# Altium PCB PCB1.PcbDoc (part 3 of 3)
Units mm, origin at the board's own origin, x right, y up, seen from the top; angles counter-clockwise.
Board outline 35.05 x 35.05 mm, 2 copper layers (Top Layer, Bottom Layer); 270 components, 213 nets, 927 pads, 0 vias.
Unrouted connection lines stored in the file: 589.
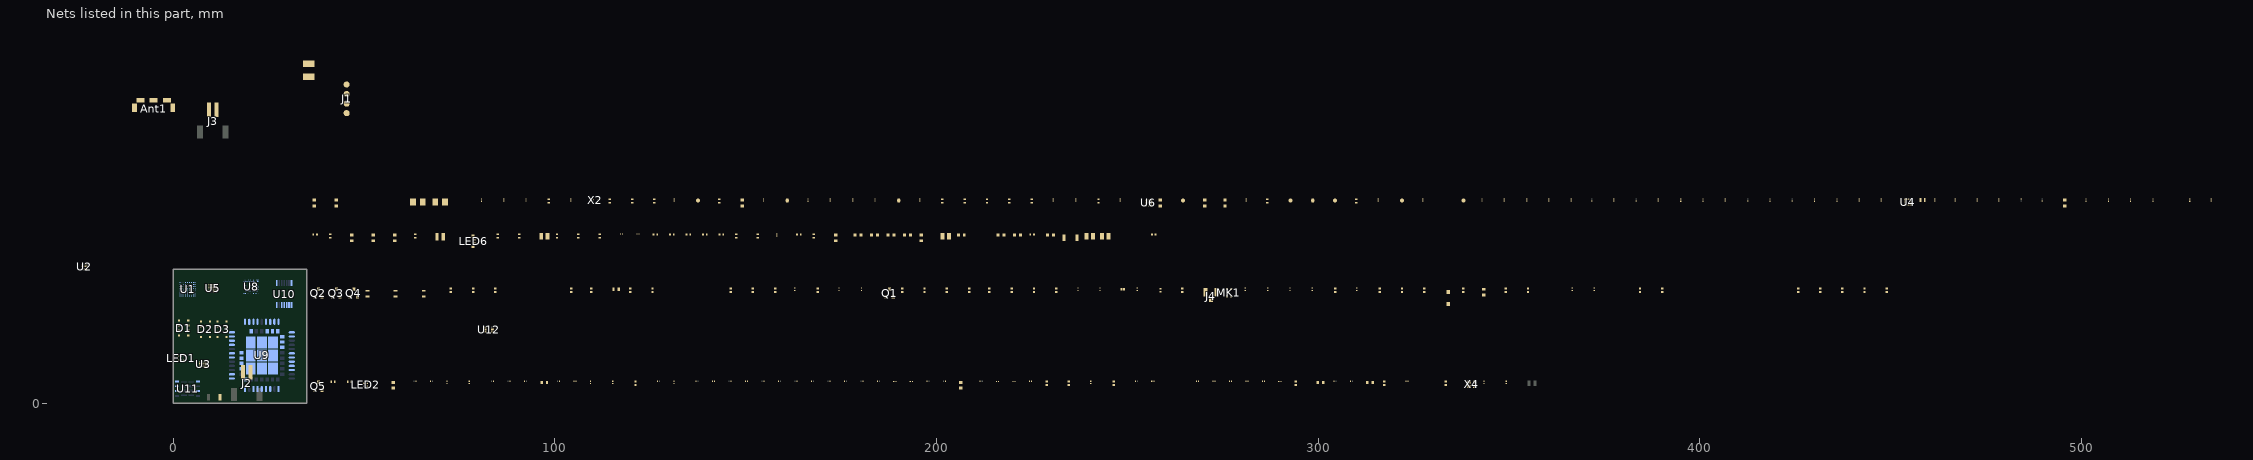
[diagram p2: the nets of this part, all layers, seen from the top]

## Part data (continued)
R1: library part AR03BTCX2502, "100mW Thin Film Resistor 50V ±25ppm/℃ ±0.1% 25kΩ 0603 Chip Resistor - Surface Mount ROHS", LCSC Part Number=C2828637, Manufacturer="Viking Tech", Package=0603, ComponentLink1Description=LCSC, ComponentLink1URL=https://www.lcsc.com/product-detail/Chip-Resistor-Surface-Mount_Viking-Tech-AR03BTCX2502_C2828637.html, Item Type=Resistor, Manufacturer Part Number=AR03BTCX2502
R2: library part HQ02WAJ0103TCE, "100mW 50V ±100ppm/℃ ±5% 10kΩ 0402 Chip Resistor - Surface Mount ROHS", LCSC Part Number=C414854, Manufacturer=UNI-ROYAL, Package=0402, ComponentLink1Description=LCSC, ComponentLink1URL=https://www.lcsc.com/product-detail/Chip-Resistor-Surface-Mount_UNI-ROYAL-Uniroyal-Elec-HQ02WAJ0103TCE_C414854.html, Item Type=Resistor, Manufacturer Part Number=HQ02WAJ0103TCE
R3 R4: library part RC0201FR-074K7L, "RES 4.7K OHM 1% 1/20W 0201", LCSC Part Number=C138135, Manufacturer=Yageo, Supplier Part Number=7537285, Category="Chip SMD Resistors", ComponentLink1Description=https://datasheet.ciiva.com/2493/pyu-r-int-thick-7-2493811.pdf?src-supplier=Digi-Key, ComponentLink1URL=https://datasheet.ciiva.com/2493/pyu-r-int-thick-7-2493811.pdf?src-supplier=Digi-Key, ComponentLink2Description=https://datasheet.ciiva.com/2493/pyu-r-int-thick-7-2493812.pdf?src-supplier=Digi-Key, ComponentLink2URL=https://datasheet.ciiva.com/2493/pyu-r-int-thick-7-2493812.pdf?src-supplier=Digi-Key, ComponentLink3Description=https://datasheet.ciiva.com/2493/pyu-r-int-thick-7-2493813.pdf?src-supplier=Digi-Key, ComponentLink3URL=https://datasheet.ciiva.com/2493/pyu-r-int-thick-7-2493813.pdf?src-supplier=Digi-Key, ComponentLink4Description=https://datasheet.ciiva.com/8892/pyu-rc0201-51-rohs-l-8-8892942.pdf?src-supplier=Avnet, ComponentLink4URL=https://datasheet.ciiva.com/8892/pyu-rc0201-51-rohs-l-8-8892942.pdf?src-supplier=Avnet, ComponentLink5Description=https://datasheet.ciiva.com/7672/1563626-7672233.pdf?src-supplier=Element14, ComponentLink5URL=https://datasheet.ciiva.com/7672/1563626-7672233.pdf?src-supplier=Element14, Item Type=Resistor, Manufacturer Part Number=RC0201FR-074K7L, Pricing="10000=0.0014, 50000=0.0013, 250000=0.0013, 750000=0.0012, 2000000=0.0011 (USD)", RoHS=Yes, Stock=1610000, Supplier="Future Electronics"
R5 R6 R7 R8 R9 R10: library part RC0402FR-0710KL, "RES 10K OHM 1% 1/16W 0402", Case Code (Imperial)=0402, Case Code (Metric)=1005, LCSC Part Number=C60490, Manufacturer=Yageo, Max Operating Temperature=155°C, Max Power Dissipation=63mW, Min Operating Temperature=-55°C, Power Rating=62.5mW, Resistance=10kR, Resistance Tolerance=1%, Resistor Type="Thick Film", Supplier Part Number 1=603-RC0402FR-0710KL, Temperature Coefficient=100ppm/°C, Voltage Rating=50V, Case/Package=0402, Category="Chip SMD Resistors", ComponentLink1Description=https://datasheet.ciiva.com/7660/38568-7660787.pdf?src-supplier=Element14, ComponentLink1URL=https://datasheet.ciiva.com/7660/38568-7660787.pdf?src-supplier=Element14, ComponentLink2Description=https://datasheet.ciiva.com/7849/1686128-7849814.pdf?src-supplier=Element14, ComponentLink2URL=https://datasheet.ciiva.com/7849/1686128-7849814.pdf?src-supplier=Element14, ComponentLink3Description=https://datasheet.ciiva.com/7983/1018594-7983486.pdf?src-supplier=Element14, ComponentLink3URL=https://datasheet.ciiva.com/7983/1018594-7983486.pdf?src-supplier=Element14, ComponentLink4Description=https://datasheet.ciiva.com/22747/1018594-22747512.pdf?src-supplier=Element14, ComponentLink4URL=https://datasheet.ciiva.com/22747/1018594-22747512.pdf?src-supplier=Element14, ComponentLink5Description=https://datasheet.ciiva.com/12667/pyu-rc0402-51-rohs-l-6-r-12667067.pdf?src-supplier=Mouser, ComponentLink5URL=https://datasheet.ciiva.com/12667/pyu-rc0402-51-rohs-l-6-r-12667067.pdf?src-supplier=Mouser, ComponentLink6Description=https://datasheet.ciiva.com/7849/1784430-7849813.pdf?src-supplier=Element14, ComponentLink6URL=https://datasheet.ciiva.com/7849/1784430-7849813.pdf?src-supplier=Element14, ComponentLink7Description=https://datasheet.ciiva.com/7849/1784430-7849815.pdf?src-supplier=Element14, ComponentLink7URL=https://datasheet.ciiva.com/7849/1784430-7849815.pdf?src-supplier=Element14, Construction=Rectangular, Depth=0.5mm, Features="Moisture Resistant", Height=0.32mm, Item Type=Resistor, Lead Free="Lead Free", Lead Pitch=0.2mm, Length=1mm, Manufacturer Part Number=RC0402FR-0710KL, Military Standard=Not, Number of Pins=2, Number of Terminations=2, Packaging="Tape and Reel", Pricing 1="1=0.10000, 10=0.01400, 50=0.01400, 100=0.00500, 1000=0.00300, 10000=0.00200 (USD)", REACH SVHC="No SVHC", RoHS=Yes, RoHS Compliant=Yes, Series=RC, Stock 1=18648329, Supplier 1=Mouser, Termination=SMD/SMT, Tolerance=1%, Voltage Rating (DC)=50V, Width=0.5mm, Working Voltage=50V
R11: library part RC0402FR-074K7L, "RES 4.7K OHM 1% 1/16W 0402", Case Code (Imperial)=0402, Case Code (Metric)=1005, LCSC Part Number=C105871, Manufacturer=Yageo, Max Operating Temperature=155°C, Max Power Dissipation=63mW, Min Operating Temperature=-55°C, Power Rating=62.5mW, Resistance=4.7kR, Resistance Tolerance=1%, Resistor Type="Thick Film", Temperature Coefficient=100ppm/°C, Voltage Rating=50V, Case/Package=0402, Category="Chip SMD Resistors", ComponentLink1Description=https://datasheet.ciiva.com/22661/1686128-22661342.pdf?src-supplier=Element14, ComponentLink1URL=https://datasheet.ciiva.com/22661/1686128-22661342.pdf?src-supplier=Element14, ComponentLink2Description=https://datasheet.ciiva.com/7850/1018594-7850022.pdf?src-supplier=Element14, ComponentLink2URL=https://datasheet.ciiva.com/7850/1018594-7850022.pdf?src-supplier=Element14, ComponentLink3Description=https://datasheet.ciiva.com/7850/1018594-7850023.pdf?src-supplier=Element14, ComponentLink3URL=https://datasheet.ciiva.com/7850/1018594-7850023.pdf?src-supplier=Element14, ComponentLink4Description=https://datasheet.ciiva.com/15215/getdatasheetpartid-328119-15215035.pdf?src-supplier=Verical, ComponentLink4URL=https://datasheet.ciiva.com/15215/getdatasheetpartid-328119-15215035.pdf?src-supplier=Verical, Construction=Rectangular, Depth=0.5mm, Features="Moisture Resistant", Height=0.32mm, Height - Seated (Max)=0.016inch, Item Type=Resistor, Lead Free="Lead Free", Length=1mm, Manufacturer Part Number=RC0402FR-074K7L, Military Standard=Not, Number of Pins=2, Number of Terminations=2, Packaging="Tape and Reel", Pricing 1="10000=0.00085 (USD)", Reach SVHC Compliant=Yes, RoHS=Yes, RoHS Compliant=Yes, Series=RC, Size Code=0402, Stock 1=2420000, Supplier 1=Avnet, Supplier Part Number 1=RC0402FR-074K7L, Termination=SMD/SMT, Tolerance=1%, Voltage Rating (DC)=50V, Width=0.5mm
R12: library part PE0402FRF470R01L, "RES 0.01 OHM 1% 1/4W 0402", Case/Package=0402, LCSC Part Number=C851613, Manufacturer=Yageo, Max Operating Temperature=125°C, Max Power Dissipation=250mW, Min Operating Temperature=-55°C, Package Quantity=10000, Supplier Part Number=13-PE0402FRF470R01LDKR-ND, Temperature Coefficient=100ppm/°C, Tolerance=1%, Category="Chip SMD Resistors", ComponentLink1Description=http://www.mouser.com/ds/2/447/PYu-PE_521_RoHS_L_3-771548.pdf?src-supplier=Mouser, ComponentLink1URL=http://www.mouser.com/ds/2/447/PYu-PE_521_RoHS_L_3-771548.pdf?src-supplier=Mouser, ComponentLink2Description=http://www.yageo.com/documents/recent/PYu-PE_521_RoHS_L_5.pdf?src-supplier=Digikey, ComponentLink2URL=http://www.yageo.com/documents/recent/PYu-PE_521_RoHS_L_5.pdf?src-supplier=Digikey, Features="Moisture Resistant,Automotive AEC-Q200", Height=0.02inch, Item Type=Resistor, Length=0.039inch, Manufacturer Part Number=PE0402FRF470R01L, Number of Terminations=2, Packaging="Tape and Reel", Pricing="1=0.87, 10=0.719, 25=0.666, 50=0.6086, 100=0.5006, 250=0.45928, 500=0.3812, 1000=0.31002, 5000=0.29578 (USD)", RoHS=Yes, Series=PE, Supplier=Digikey, Width=0.02inch
R13 R79: library part RC0402FR-07100KL, "RES 100K OHM 1% 1/16W 0402", Case Code (Imperial)=0402, Case Code (Metric)=1005, LCSC Part Number=C60491, Manufacturer=Yageo, Max Operating Temperature=155°C, Max Power Dissipation=63mW, Min Operating Temperature=-55°C, Package Quantity=1, Resistance=100kR, Resistance Tolerance=1%, Resistor Type="Thick Film", Supplier Part Number 1=603-RC0402FR-07100KL, Temperature Coefficient=100ppm/°C, Voltage Rating=50V, Case/Package=0402, Category="Chip SMD Resistors", ComponentLink1Description=https://datasheet.ciiva.com/11819/0900766b80c66297-11819452.pdf?src-supplier=RSComponents, ComponentLink1URL=https://datasheet.ciiva.com/11819/0900766b80c66297-11819452.pdf?src-supplier=RSComponents, ComponentLink2Description=https://datasheet.ciiva.com/22747/1018594-22747509.pdf?src-supplier=Element14, ComponentLink2URL=https://datasheet.ciiva.com/22747/1018594-22747509.pdf?src-supplier=Element14, ComponentLink3Description=https://datasheet.ciiva.com/2453/pyu-r-int-thick-7-2453362.pdf?src-supplier=Digi-Key, ComponentLink3URL=https://datasheet.ciiva.com/2453/pyu-r-int-thick-7-2453362.pdf?src-supplier=Digi-Key, ComponentLink4Description=https://datasheet.ciiva.com/2453/pyu-r-int-thick-7-2453363.pdf?src-supplier=Digi-Key, ComponentLink4URL=https://datasheet.ciiva.com/2453/pyu-r-int-thick-7-2453363.pdf?src-supplier=Digi-Key, ComponentLink5Description=https://datasheet.ciiva.com/2453/pyu-r-int-thick-7-2453361.pdf?src-supplier=Digi-Key, ComponentLink5URL=https://datasheet.ciiva.com/2453/pyu-r-int-thick-7-2453361.pdf?src-supplier=Digi-Key, ComponentLink6Description=https://datasheet.ciiva.com/12667/pyu-rc0402-51-rohs-l-6-r-12667930.pdf?src-supplier=Mouser, ComponentLink6URL=https://datasheet.ciiva.com/12667/pyu-rc0402-51-rohs-l-6-r-12667930.pdf?src-supplier=Mouser, ComponentLink7Description=https://datasheet.ciiva.com/15189/getdatasheetpartid-323696-15189334.pdf?src-supplier=Verical, ComponentLink7URL=https://datasheet.ciiva.com/15189/getdatasheetpartid-323696-15189334.pdf?src-supplier=Verical, Construction=Rectangular, Depth=0.5mm, Features="Moisture Resistant", Height=0.016inch, Item Type=Resistor, Lead Free="Lead Free", Length=0.039inch, Manufacturer Part Number=RC0402FR-07100KL, Military Standard=Not, Number of Terminations=2, Packaging="Tape and Reel", Power Rating=63mW, Pricing 1="1=0.10000, 10=0.01200, 50=0.01200, 100=0.00500, 1000=0.00300, 2500=0.00200, 10000=0.00100 (USD)", REACH SVHC="No SVHC", RoHS=Yes, RoHS Compliant=Yes, Series=RC, Stock 1=7759549, Supplier 1=Mouser, Technology="THICK FILM", Termination=SMD/SMT, Tolerance=1%, Width=0.02inch, Working Voltage=50V
R14: library part RC0603FR-07215KL, "RES 215K OHM 1% 1/10W 0603", LCSC Part Number=C185350, Manufacturer=Yageo, Supplier Part Number=9235490, Voltage Rating (DC)=50V, Category="Chip SMD Resistors", ComponentLink1Description=https://datasheet.ciiva.com/2553/pyu-r-int-thick-7-2553530.pdf?src-supplier=Digi-Key, ComponentLink1URL=https://datasheet.ciiva.com/2553/pyu-r-int-thick-7-2553530.pdf?src-supplier=Digi-Key, ComponentLink2Description=https://datasheet.ciiva.com/2553/pyu-r-int-thick-7-2553531.pdf?src-supplier=Digi-Key, ComponentLink2URL=https://datasheet.ciiva.com/2553/pyu-r-int-thick-7-2553531.pdf?src-supplier=Digi-Key, ComponentLink3Description=https://datasheet.ciiva.com/2553/pyu-r-int-thick-7-2553532.pdf?src-supplier=Digi-Key, ComponentLink3URL=https://datasheet.ciiva.com/2553/pyu-r-int-thick-7-2553532.pdf?src-supplier=Digi-Key, ComponentLink4Description=https://datasheet.ciiva.com/15189/getdatasheetpartid-323775-15189654.pdf?src-supplier=Verical, ComponentLink4URL=https://datasheet.ciiva.com/15189/getdatasheetpartid-323775-15189654.pdf?src-supplier=Verical, Item Type=Resistor, Manufacturer Part Number=RC0603FR-07215KL, Pricing="5000=0.0014, 75000=0.0013, 200000=0.0013, 750000=0.0012, 2000000=0.0011 (USD)", RoHS=Yes, Stock=395000, Supplier="Future Electronics"
R15: library part RC0402FR-0743KL, "RES 43K OHM 1% 1/16W 0402", Case Code (Imperial)=0402, Case Code (Metric)=1005, LCSC Part Number=C185415, Manufacturer=Yageo, Max Operating Temperature=155°C, Max Power Dissipation=63mW, Min Operating Temperature=-55°C, Package Quantity=1, Resistance=43kR, Resistance Tolerance=1%, Resistor Type="Thick Film", Supplier Part Number 1=311-43.0KLRCT-ND, Temperature Coefficient=100ppm/°C, Voltage Rating=50V, Case/Package=0402, Category="Chip SMD Resistors", ComponentLink1Description=https://datasheet.ciiva.com/11819/0900766b80c66297-11819515.pdf?src-supplier=RSComponents, ComponentLink1URL=https://datasheet.ciiva.com/11819/0900766b80c66297-11819515.pdf?src-supplier=RSComponents, ComponentLink2Description=https://datasheet.ciiva.com/7850/1018594-7850009.pdf?src-supplier=Element14, ComponentLink2URL=https://datasheet.ciiva.com/7850/1018594-7850009.pdf?src-supplier=Element14, ComponentLink3Description=https://datasheet.ciiva.com/7850/1018594-7850008.pdf?src-supplier=Element14, ComponentLink3URL=https://datasheet.ciiva.com/7850/1018594-7850008.pdf?src-supplier=Element14, ComponentLink4Description=https://datasheet.ciiva.com/2453/pyu-r-int-thick-7-2453665.pdf?src-supplier=Digi-Key, ComponentLink4URL=https://datasheet.ciiva.com/2453/pyu-r-int-thick-7-2453665.pdf?src-supplier=Digi-Key, ComponentLink5Description=https://datasheet.ciiva.com/2453/pyu-r-int-thick-7-2453666.pdf?src-supplier=Digi-Key, ComponentLink5URL=https://datasheet.ciiva.com/2453/pyu-r-int-thick-7-2453666.pdf?src-supplier=Digi-Key, ComponentLink6Description=https://datasheet.ciiva.com/2453/pyu-r-int-thick-7-2453664.pdf?src-supplier=Digi-Key, ComponentLink6URL=https://datasheet.ciiva.com/2453/pyu-r-int-thick-7-2453664.pdf?src-supplier=Digi-Key, Construction=Rectangular, Depth=0.5mm, Features="Moisture Resistant", Height=0.016inch, Item Type=Resistor, Lead Free="Lead Free", Length=1mm, Manufacturer Part Number=RC0402FR-0743KL, Military Standard=Not, Number of Terminations=2, Packaging="Tape and Reel", Power Rating=63mW, Pricing 1="1=0.10000, 10=0.01400, 100=0.00580, 1000=0.00262, 2500=0.00228, 5000=0.00188 (USD)", RoHS=Yes, RoHS Compliant=Yes, Series=RC, Size Code=0402, Stock 1=923044, Supplier 1=Digi-Key, Technology="THICK FILM", Termination=SMD/SMT, Tolerance=1%, Voltage Rating (DC)=50V, Weight=2.3E-05oz, Width=0.02inch
R16: library part 0201WMF100JTEE, "50mW Thick Film Resistors 25V ±1% ±200ppm/℃ 10Ω 0201 Chip Resistor - Surface Mount ROHS", LCSC Part Number=C270817, Manufacturer=UNI-ROYAL, Package=0201, ComponentLink1Description=LCSC, ComponentLink1URL=https://www.lcsc.com/product-detail/Chip-Resistor-Surface-Mount_UNI-ROYAL-Uniroyal-Elec-0201WMF100JTEE_C270817.html, Item Type=Resistor, Manufacturer Part Number=0201WMF100JTEE
R17 R18 R19 R20 R21 R22 R24 R25 R27 R28 R29 R30 R31 R32 R33 R34 R37 R38 R39 R41 R44 R45 R46 R48 R53 R54 R55 R56 R57 R58 R61 R62 R65 R66 R67 R68 R69 R70 R74 R80 R81 R82 R83 R84 R85 R86 R87 R88 R89 R90 R91 R92 R93 R94 R95 R96 R97 R98 R99 R100 R101 R102 R103 R104 R105 R106 R107 R108 R109 R110 R111 R112 R113: library part 0201WMF0000TEE, "50mW Thick Film Resistors 25V ±1% 0Ω 0201 Chip Resistor - Surface Mount ROHS", LCSC Part Number=C473473, Manufacturer=UNI-ROYAL, Package=0201, ComponentLink1Description=LCSC, ComponentLink1URL=https://www.lcsc.com/product-detail/Chip-Resistor-Surface-Mount_UNI-ROYAL-Uniroyal-Elec-0201WMF0000TEE_C473473.html, Item Type=Resistor, Manufacturer Part Number=0201WMF0000TEE
R23 R35: library part RC0201FR-073K3L, "RES 3.3K OHM 1% 1/20W 0201", LCSC Part Number=C274874, Manufacturer=Yageo, Supplier Part Number=1068525, Category="Chip SMD Resistors", ComponentLink1Description=https://datasheet.ciiva.com/14985/pyu-r-int-thick-7-14985418.pdf?src-supplier=Digi-Key, ComponentLink1URL=https://datasheet.ciiva.com/14985/pyu-r-int-thick-7-14985418.pdf?src-supplier=Digi-Key, ComponentLink2Description=https://datasheet.ciiva.com/22698/1563626-22698524.pdf?src-supplier=Element14, ComponentLink2URL=https://datasheet.ciiva.com/22698/1563626-22698524.pdf?src-supplier=Element14, Item Type=Resistor, Manufacturer Part Number=RC0201FR-073K3L, Pricing="10000=0.0009, 50000=0.0013, 100000=0.0008, 250000=0.0013, 400000=0.0008, 750000=0.0012, 1500000=0.0007, 2000000=0.0011, 5000000=0.0007 (USD)", RoHS=Yes, Stock=40000, Supplier="Future Electronics"
R26 R36 R43: library part 0201WMF1002TEE, "50mW Thick Film Resistors 25V ±1% ±200ppm/℃ 10kΩ 0201 Chip Resistor - Surface Mount ROHS", LCSC Part Number=C473048, Manufacturer=UNI-ROYAL, Package=0201, ComponentLink1Description=LCSC, ComponentLink1URL=https://www.lcsc.com/product-detail/Chip-Resistor-Surface-Mount_UNI-ROYAL-Uniroyal-Elec-0201WMF1002TEE_C473048.html, Item Type=Resistor, Manufacturer Part Number=0201WMF1002TEE
R40: library part RC0402FR-070RL, "1/16W 0402", Case Code (Imperial)=0402, Case Code (Metric)=1005, LCSC Part Number=C106231, Manufacturer=Yageo, Max Operating Temperature=155°C, Max Power Dissipation=63mW, Min Operating Temperature=-55°C, Power Rating=62.5mW, Resistance=0R, Resistor Type="Thick Film", Supplier Part Number 1=603-RC0402FR-070RL, Temperature Coefficient=200ppm/°C, Tolerance=1%, Voltage Rating=50V, Case/Package=0402, ComponentLink1Description=https://datasheet.ciiva.com/8896/pyu-rc0402-51-rohs-l-6-8896149.pdf?src-supplier=Avnet, ComponentLink1URL=https://datasheet.ciiva.com/8896/pyu-rc0402-51-rohs-l-6-8896149.pdf?src-supplier=Avnet, ComponentLink2Description=https://datasheet.ciiva.com/16790/pyu-rc0402-51-rohs-l-6-r-16790444.pdf?src-supplier=Future+Electronics, ComponentLink2URL=https://datasheet.ciiva.com/16790/pyu-rc0402-51-rohs-l-6-r-16790444.pdf?src-supplier=Future+Electronics, Contact Plating=Tin,Matte, Features="Moisture Resistant", Height=0.35mm, Item Type=Resistors, Lead Free="Lead Free", Length=1mm, Manufacturer Part Number=RC0402FR-070RL, Mount="Surface Mount", Number of Terminations=2, Packaging="Tape and Reel", Pricing 1="1=0.10000, 10=0.01400, 50=0.01400, 100=0.00600, 1000=0.00300, 5000=0.00200, 10000=0.00100 (USD)", Radiation Hardening=No, RoHS=Yes, RoHS Compliant=Yes, Series=RC, Size Code=0402, Stock 1=8556842, Supplier 1=Mouser, Termination=SMD/SMT, Width=0.5mm
R42 R47 R51 R52 R63 R64: library part MR04X1002FTL, "100mW Thick Film Resistors 50V ±100ppm/℃ ±1% 10kΩ 0402 Chip Resistor - Surface Mount ROHS", LCSC Part Number=C327797, Manufacturer="Walsin Tech Corp", Package=0402, ComponentLink1Description=LCSC, ComponentLink1URL=https://www.lcsc.com/product-detail/Chip-Resistor-Surface-Mount_Walsin-Tech-Corp-MR04X1002FTL_C327797.html, Item Type=Resistor, Manufacturer Part Number=MR04X1002FTL
R49 R50: library part HP02WAF1003TCE, "100mW Thick Film Resistors 50V ±100ppm/℃ ±1% 100kΩ 0402 Chip Resistor - Surface Mount ROHS", LCSC Part Number=C2759534, Manufacturer=UNI-ROYAL, Package=0402, ComponentLink1Description=LCSC, ComponentLink1URL=https://www.lcsc.com/product-detail/Chip-Resistor-Surface-Mount_UNI-ROYAL-Uniroyal-Elec-HP02WAF1003TCE_C2759534.html, Item Type=Resistor, Manufacturer Part Number=HP02WAF1003TCE
R59 R60: library part RC1206JR-070RL, "RES 0 OHM JUMPER 1/4W 1206", Case Code (Imperial)=1206, Case Code (Metric)=3216, Manufacturer=Yageo, Max Operating Temperature=155°C, Max Power Dissipation=250mW, Min Operating Temperature=-55°C, Package Quantity=1, Resistance Tolerance=5%, Resistor Type="Thick Film,Carbon Film", Supplier Part Number=1414689, Temperature Coefficient=200ppm/°C, Voltage Rating=200V, Case/Package=1206, ComponentLink1Description=https://datasheet.ciiva.com/11808/0900766b80c6630a-11808156.pdf?src-supplier=Rs, ComponentLink1URL=https://datasheet.ciiva.com/11808/0900766b80c6630a-11808156.pdf?src-supplier=Rs, ComponentLink2Description=https://datasheet.ciiva.com/29181/402222-da-01-en-smd-widerstand-0-ohm-1206-29181568.pdf?src-supplier=Conrad, ComponentLink2URL=https://datasheet.ciiva.com/29181/402222-da-01-en-smd-widerstand-0-ohm-1206-29181568.pdf?src-supplier=Conrad, ComponentLink3Description=https://datasheet.ciiva.com/7983/444357-7983807.pdf?src-supplier=Element14, ComponentLink3URL=https://datasheet.ciiva.com/7983/444357-7983807.pdf?src-supplier=Element14, ComponentLink4Description=https://datasheet.ciiva.com/22747/1692832-22747541.pdf?src-supplier=Element14, ComponentLink4URL=https://datasheet.ciiva.com/22747/1692832-22747541.pdf?src-supplier=Element14, ComponentLink5Description=https://datasheet.ciiva.com/46445/444357-46445719.pdf?src-supplier=Element14, ComponentLink5URL=https://datasheet.ciiva.com/46445/444357-46445719.pdf?src-supplier=Element14, ComponentLink6Description=https://datasheet.ciiva.com/2458/pyu-rc1206-51-rohs-l-4-2458669.pdf?src-supplier=Digikey, ComponentLink6URL=https://datasheet.ciiva.com/2458/pyu-rc1206-51-rohs-l-4-2458669.pdf?src-supplier=Digikey, ComponentLink7Description=https://datasheet.ciiva.com/2458/pyu-rc1206-51-rohs-l-4-2458670.pdf?src-supplier=Digikey, ComponentLink7URL=https://datasheet.ciiva.com/2458/pyu-rc1206-51-rohs-l-4-2458670.pdf?src-supplier=Digikey, ComponentLink8Description=https://datasheet.ciiva.com/2458/pyu-rc1206-51-rohs-l-4-2458668.pdf?src-supplier=Digikey, ComponentLink8URL=https://datasheet.ciiva.com/2458/pyu-rc1206-51-rohs-l-4-2458668.pdf?src-supplier=Digikey, ComponentLink9Description=https://datasheet.ciiva.com/7857/1692832-7857422.pdf?src-supplier=Element14, ComponentLink9URL=https://datasheet.ciiva.com/7857/1692832-7857422.pdf?src-supplier=Element14, ComponentLink10Description=https://datasheet.ciiva.com/7857/1692832-7857421.pdf?src-supplier=Element14, ComponentLink10URL=https://datasheet.ciiva.com/7857/1692832-7857421.pdf?src-supplier=Element14, ComponentLink11Description=https://datasheet.ciiva.com/17035/pyu-rc1206-51-rohs-l-4-17035512.pdf?src-supplier=Future+Electronics, ComponentLink11URL=https://datasheet.ciiva.com/17035/pyu-rc1206-51-rohs-l-4-17035512.pdf?src-supplier=Future+Electronics, Contact Plating=Tin,Matte, Depth=1.6mm, Features="Moisture Resistant", Height=0.026inch, Item Type=Resistors, Lead Free=5697LeadFree, Length=0.122inch, Manufacturer Part Number=RC1206JR-070RL, Number of Terminations=2, Packaging="Tape and Reel", Power Rating=250mW, Pricing="5000=0.0025, 15000=0.0039, 25000=0.0023, 50000=0.0037, 100000=0.0022, 200000=0.0035, 250000=0.0021, 625000=0.002 (USD)", Reach SVHC Compliant=Unknown, RoHS=Yes, RoHS Compliant=Yes, Series=RC, Stock=1115000, Supplier="Future Electronics", Technology="THICK FILM", Termination=SMD/SMT, Tolerance=5%, Width=0.063inch
R71 R72 R73 R75: library part RC0402FR-0722RL, "RES 22 OHM 1% 1/16W 0402", Case Code (Imperial)=0402, Case Code (Metric)=1005, LCSC Part Number=C114765, Manufacturer=Yageo, Max Operating Temperature=155°C, Max Power Dissipation=63mW, Min Operating Temperature=-55°C, Power Rating=62.5mW, Resistance Tolerance=1%, Resistor Type="Thick Film", Temperature Coefficient=100ppm/°C, Voltage Rating=50V, Case/Package=0402, Category="Chip SMD Resistors", ComponentLink1Description=https://datasheet.ciiva.com/11819/0900766b80c66297-11819462.pdf?src-supplier=RSComponents, ComponentLink1URL=https://datasheet.ciiva.com/11819/0900766b80c66297-11819462.pdf?src-supplier=RSComponents, ComponentLink2Description=https://datasheet.ciiva.com/7849/1018594-7849912.pdf?src-supplier=Element14, ComponentLink2URL=https://datasheet.ciiva.com/7849/1018594-7849912.pdf?src-supplier=Element14, ComponentLink3Description=https://datasheet.ciiva.com/7849/1018594-7849911.pdf?src-supplier=Element14, ComponentLink3URL=https://datasheet.ciiva.com/7849/1018594-7849911.pdf?src-supplier=Element14, ComponentLink4Description=https://datasheet.ciiva.com/16930/pyu-rc0402-51-rohs-l-6-r-16930687.pdf?src-supplier=Future+Electronics, ComponentLink4URL=https://datasheet.ciiva.com/16930/pyu-rc0402-51-rohs-l-6-r-16930687.pdf?src-supplier=Future+Electronics, ComponentLink5Description=https://datasheet.ciiva.com/26829/getdatasheetpartid-554995-26829991.pdf?src-supplier=Verical, ComponentLink5URL=https://datasheet.ciiva.com/26829/getdatasheetpartid-554995-26829991.pdf?src-supplier=Verical, Construction=Rectangular, Depth=0.5mm, Features="Moisture Resistant", Height=0.32mm, Item Type=Resistor, Lead Free="Lead Free", Length=1mm, Manufacturer Part Number=RC0402FR-0722RL, Military Standard=Not, Number of Pins=2, Number of Terminations=2, Packaging="Tape and Reel", Pricing 1="10000=0.00085 (USD)", Reach SVHC Compliant=Yes, Resistance=22R, RoHS=Yes, RoHS Compliant=Yes, Series=RC, Size Code=0402, Stock 1=1810000, Supplier 1=Avnet, Supplier Part Number 1=RC0402FR-0722RL, Technology="THICK FILM", Termination=SMD/SMT, Tolerance=1%, Voltage Rating (DC)=50V, Width=0.5mm
R76 R77 R78: library part RC0402JR-071KL, "RES 1K OHM 5% 1/16W 0402", Case Code (Imperial)=0402, Case Code (Metric)=1005, LCSC Part Number=C105637, Manufacturer=Yageo, Max Operating Temperature=155°C, Max Power Dissipation=63mW, Min Operating Temperature=-55°C, Package Quantity=1, Power Rating=62.5mW, Resistance=1kR, Resistance Tolerance=5%, Resistor Type="Thick Film", Supplier Part Number 1=311-1.0KJRCT-ND, Temperature Coefficient=100ppm/°C, Voltage Rating=50V, Case/Package=0402, Category="Chip SMD Resistors", ComponentLink1Description=https://datasheet.ciiva.com/7983/1018594-7983558.pdf?src-supplier=Element14, ComponentLink1URL=https://datasheet.ciiva.com/7983/1018594-7983558.pdf?src-supplier=Element14, ComponentLink2Description=https://datasheet.ciiva.com/2452/pyu-r-int-thick-7-2452756.pdf?src-supplier=Digi-Key, ComponentLink2URL=https://datasheet.ciiva.com/2452/pyu-r-int-thick-7-2452756.pdf?src-supplier=Digi-Key, ComponentLink3Description=https://datasheet.ciiva.com/2452/pyu-r-int-thick-7-2452757.pdf?src-supplier=Digi-Key, ComponentLink3URL=https://datasheet.ciiva.com/2452/pyu-r-int-thick-7-2452757.pdf?src-supplier=Digi-Key, ComponentLink4Description=https://datasheet.ciiva.com/2452/pyu-r-int-thick-7-2452755.pdf?src-supplier=Digi-Key, ComponentLink4URL=https://datasheet.ciiva.com/2452/pyu-r-int-thick-7-2452755.pdf?src-supplier=Digi-Key, ComponentLink5Description=https://datasheet.ciiva.com/7850/1018594-7850170.pdf?src-supplier=Element14, ComponentLink5URL=https://datasheet.ciiva.com/7850/1018594-7850170.pdf?src-supplier=Element14, ComponentLink6Description=https://datasheet.ciiva.com/7850/1018594-7850171.pdf?src-supplier=Element14, ComponentLink6URL=https://datasheet.ciiva.com/7850/1018594-7850171.pdf?src-supplier=Element14, ComponentLink7Description=https://datasheet.ciiva.com/17081/pyu-rc0402-51-rohs-l-6-r-17081438.pdf?src-supplier=Future+Electronics, ComponentLink7URL=https://datasheet.ciiva.com/17081/pyu-rc0402-51-rohs-l-6-r-17081438.pdf?src-supplier=Future+Electronics, Construction=Rectangular, Depth=0.5mm, Features="Moisture Resistant", Height=0.016inch, Item Type=Resistor, Lead Free="Lead Free", Length=0.039inch, Manufacturer Part Number=RC0402JR-071KL, Military Standard=Not, Number of Terminations=2, Packaging="Tape and Reel", Pricing 1="1=0.10000, 10=0.01300, 100=0.00540, 1000=0.00244, 2500=0.00212, 5000=0.00175 (USD)", REACH SVHC="No SVHC", RoHS=Yes, RoHS Compliant=Yes, Series=RC, Size Code=0402, Stock 1=452315, Supplier 1=Digi-Key, Termination=SMD/SMT, Tolerance=5%, Width=0.02inch
R114 R115: library part SR0402FR-7T10KL, "RES 10K OHM 1% 1/5W 0402", LCSC Part Number=C854480, Manufacturer=Yageo, Supplier Part Number 1=YAG5815CT-ND, ComponentLink1Description=http://www.yageo.com/documents/recent/PYu-SR_D_F%20tol_RoHS_L_3.pdf?src-supplier=Digi-Key, ComponentLink1URL=http://www.yageo.com/documents/recent/PYu-SR_D_F%20tol_RoHS_L_3.pdf?src-supplier=Digi-Key, Manufacturer Part Number=SR0402FR-7T10KL, Pricing 1="1=0.56, 10=0.398, 100=0.2072, 1000=0.11156, 2500=0.10757, 5000=0.10598 (USD)", RoHS Compliant=Yes, Stock 1=7859, Supplier 1=Digi-Key
RT1: library part NCP03XH103J05RL, "Thermistor NTC 10K Ohm 5% 2-Pin 0201 Surface Mount Solder Pad 3434K Paper T/R", Case Code (Imperial)=0201, Case Code (Metric)=0603, Current Rating=310uA, LCSC Part Number=C914154, Manufacturer=Murata, Max Current Rating=100uA, Max Operating Temperature=125°C, Max Power Dissipation=100mW, Min Operating Temperature=-40°C, Package Quantity=1, Resistance Tolerance=5%, Voltage Rating=5V, Accuracy=1%, Case/Package=0201, ComponentLink1Description=https://datasheet.ciiva.com/30488/0900766b81259d06-30488178.pdf?src-supplier=Rs, ComponentLink1URL=https://datasheet.ciiva.com/30488/0900766b81259d06-30488178.pdf?src-supplier=Rs, ComponentLink2Description=https://datasheet.ciiva.com/2848/ncp03-spec-2848344.pdf?src-supplier=Digikey, ComponentLink2URL=https://datasheet.ciiva.com/2848/ncp03-spec-2848344.pdf?src-supplier=Digikey, ComponentLink3Description=https://datasheet.ciiva.com/2848/ncp03-spec-2848345.pdf?src-supplier=Digikey, ComponentLink3URL=https://datasheet.ciiva.com/2848/ncp03-spec-2848345.pdf?src-supplier=Digikey, ComponentLink4Description=https://datasheet.ciiva.com/2848/ncp03-spec-2848343.pdf?src-supplier=Digikey, ComponentLink4URL=https://datasheet.ciiva.com/2848/ncp03-spec-2848343.pdf?src-supplier=Digikey, Depth=0.3mm, Height=0.3mm, Item Type=Thermistors, Lead Free="Lead Free", Length=0.6mm, Manufacturer Part Number=NCP03XH103J05RL, Mounting Technology="Surface Mount", Packaging="Tape and Reel", Pins=2, Power Rating=100mW, Pricing="15000=0.0365, 30000=0.0359, 45000=0.0356, 60000=0.0354, 75000=0.0347 (USD)", RoHS=Yes, RoHS Compliant=Yes, Series=NCP03, Stock=15000, Supplier="Future Electronics", Termination=SMD/SMT, Tolerance=5%
SW1: "SWITCH TACTILE SPST-NO 0.05A 12V", Contact Current Rating=50mA, Contact Resistance=100mR, Insulation Resistance=100MR, LCSC Part Number=C231329, Manufacturer=Omron, Max Operating Temperature=70°C, Max Voltage Rating (DC)=12V, Min Operating Temperature=-25°C, Operating Force=1.5N, Package Quantity=1, Ratings="Dust Proof,IP40", Supplier Part Number 1=SW1020DKR-ND, Actuator Length=0.4mm, Actuator Type=Standard, ComponentLink1Description=http://www.farnell.com/datasheets/60838.pdf?src-supplier=Farnell, ComponentLink1URL=http://www.farnell.com/datasheets/60838.pdf?src-supplier=Farnell, ComponentLink2Description=http://www.farnell.com/datasheets/60838.pdf?src-supplier=Element14, ComponentLink2URL=http://www.farnell.com/datasheets/60838.pdf?src-supplier=Element14, ComponentLink3Description=https://omronfs.omron.com/en_US/ecb/products/pdf/en-b3u.pdf?src-supplier=Digi-Key, ComponentLink3URL=https://omronfs.omron.com/en_US/ecb/products/pdf/en-b3u.pdf?src-supplier=Digi-Key, ComponentLink4Description=http://www.omron.com/ecb/products/pdf/en-b3u.pdf?src-supplier=Digi-Key, ComponentLink4URL=http://www.omron.com/ecb/products/pdf/en-b3u.pdf?src-supplier=Digi-Key, ComponentLink5Description=https://www.distrelec.biz/Web/Downloads/he/et/B3U_eng_datasheet.pdf?mime=application%2Fpdf&src-supplier=Distrelec, ComponentLink5URL=https://www.distrelec.biz/Web/Downloads/he/et/B3U_eng_datasheet.pdf?mime=application%2Fpdf&src-supplier=Distrelec, ComponentLink6Description=http://www.onlinecomponents.com/productFiles/mf-OM/en-b3u.pdf?src-supplier=Onlinecomponents.com, ComponentLink6URL=http://www.onlinecomponents.com/productFiles/mf-OM/en-b3u.pdf?src-supplier=Onlinecomponents.com, ComponentLink7Description=https://www.verical.com/server-webapp/html/getDatasheet?partID=552554&src-supplier=Verical, ComponentLink7URL=https://www.verical.com/server-webapp/html/getDatasheet?partID=552554&src-supplier=Verical, ComponentLink8Description=http://www.farnell.com/datasheets/1685550.pdf?src-supplier=Element14, ComponentLink8URL=http://www.farnell.com/datasheets/1685550.pdf?src-supplier=Element14, ComponentLink9Description=http://www.farnell.com/datasheets/2610940.pdf?src-supplier=Farnell, ComponentLink9URL=http://www.farnell.com/datasheets/2610940.pdf?src-supplier=Farnell, ComponentLink10Description=https://www.alliedelec.com/m/d/4c8a9ef82804fc3c241a13c1e298fd73.pdf?src-supplier=Allied+Electronics, ComponentLink10URL=https://www.alliedelec.com/m/d/4c8a9ef82804fc3c241a13c1e298fd73.pdf?src-supplier=Allied+Electronics, Contact Material=Silver, Current Rating=50mA, Depth=2.5mm, Electrical Life=200000Cycles, Height=1.2mm, Illumination Type=Non-Illuminated,Illuminated, Item Type=Switch, Lead Free="Lead Free", Length=4mm, Manufacturer Part Number=B3U-1000P, Max Current Rating=50mA, Mechanical Life=200000Cycles, Mount="Surface Mount", Orientation=Straight, Packaging="Tape and Reel", Pricing 1="1=1, 10=0.961, 25=0.9064, 50=0.7976, 100=0.7251, 250=0.68888, 500=0.67074, 1000=0.52571 (USD)", REACH SVHC=Unknown, Stock 1=116454, Supplier 1=Digi-Key, Switch Function=Off-Mom, Switch Travel=0.15mm, Termination=SMD/SMT, Throw Configuration=SPST, Voltage Rating (DC)=12V, Weight=0.000776oz, Width=3mm
TP1 TP2 TP3 TP4 TP5 TP6 TP7 TP8 TP9: "Test Point ON", Item Type="Test Point", Manufacturer Part Number="TEST POINT 0.5mm Dia"
U1: "IC BATT FUEL LI-ION 1C 72WLP", Manufacturer="Analog Devices", Supplier Part Number=505-MAX20360AEWZ+-ND, Item Type=IC, Manufacturer Part Number=MAX20360AEWZ+, Supplier=Digikey
U2: "Step-down type Fixed 1.8V 2.7V~5.5V 3A QFN-7(1.5x1.5) DC-DC Converters ROHS", LCSC Part Number=C3151906, Manufacturer="Silergy Corp", Package=QFN-7(1.5x1.5), ComponentLink1Description=LCSC, ComponentLink1URL=https://www.lcsc.com/product-detail/DC-DC-Converters_Silergy-Corp-SY8843QWC_C3151906.html, Item Type=IC, Manufacturer Part Number=SY8843QWC
U3: "SENSOR/ALGORITHM HUB", Manufacturer="Analog Devices", Supplier Part Number=175-MAX32674CGWG+TR-ND, Item Type=IC, Manufacturer Part Number=MAX32674CGWG+, RoHS=No, Supplier=Digikey
U4: "ACCEL 2-16G I2C/SPI 12LGA", LCSC Part Number=C5337244, Manufacturer=STMicroelectronics, ComponentLink1Description=http://www.farnell.com/datasheets/2028148.pdf?src-supplier=Farnell, ComponentLink1URL=http://www.farnell.com/datasheets/2028148.pdf?src-supplier=Farnell, ComponentLink2Description=https://datasheet.octopart.com/LIS2DS12-STMicroelectronics-datasheet-62333086.pdf?src-supplier=Element14, ComponentLink2URL=https://datasheet.octopart.com/LIS2DS12-STMicroelectronics-datasheet-62333086.pdf?src-supplier=Element14, ComponentLink3Description=http://www.farnell.com/datasheets/2028148.pdf?src-supplier=Newark, ComponentLink3URL=http://www.farnell.com/datasheets/2028148.pdf?src-supplier=Newark, Item Type=Accelerometers, Manufacturer Part Number=LIS2DS12, Pricing="1=1.9, 10=1.61, 100=1.29, 500=1.2, 1000=1.07 (USD)", RoHS=Yes, Stock=1431, Supplier=Avnet
U5: "Ultra-Low-Power, Optical PPG and Single-Lead ECG AFE", Manufacturer="Analog Devices", ComponentLink1Description=LCSC, ComponentLink1URL=https://www.lcsc.com/product-detail/Specialized-Sensors_Analog-Devices-Inc-Maxim-Integrated-MAX86176ENX-T_C3197546.html, Item Type=IC, Manufacturer Part Number=MAX86176ENX+T, Supplier=Digikey
U6: "Temperature Sensor Digital, Local 0Â°C ~ 70Â°C 16 b 10-LGA (2x2)", Package="WFLGA-10 Maxim Integrated", Availability="In Stock", Check_prices=https://www.snapeda.com/parts/MAX30208CLB+T/Maxim+Integrated/view-part/?ref=eda, MF="Maxim Integrated", MP=MAX30208CLB+T, Price=None, Purchase-URL=https://pricing.snapeda.com/search/part/MAX30208CLB+T/?ref=eda, SnapEDA_Link=https://www.snapeda.com/parts/MAX30208CLB+T/Maxim+Integrated/view-part/?ref=snap
U8: "IC RF TXRX+MCU 802.15.4 95WLCSP", LCSC Part Number=C3606790, Manufacturer="Nordic Semiconductor", Item Type=IC, Manufacturer Part Number=NRF5340-CLAA-R7, Pricing="1=7.28, 100=6.2, 500=5.39004 (USD)", RoHS=No, Stock=2282, Supplier=Digikey
U9: "SIM868 GNSS, GSM RF mikroBUSâ„¢ Clickâ„¢ Platform Evaluation Expansion Board", Package=None, Availability="Not in stock", Check_prices=https://www.snapeda.com/parts/SIM868/MikroElektronika/view-part/?ref=eda, MF=MikroElektronika, MP=SIM868, Price=None, SnapEDA_Link=https://www.snapeda.com/parts/SIM868/MikroElektronika/view-part/?ref=snap
U10: "4-Bit Bidirectional Voltage-Level Shifter with Auto Direction Sensing and +/-15 kV ESD Protect 14-TSSOP -40 to 85", LCSC Part Number=C60708, Manufacturer="Texas Instruments", Min Supply Voltage (DC)=1.2V, Package=14-TSSOP, Supplier Part Number=296-21929-1-ND, Category="Voltage Level Shifters", ComponentLink1Description=https://datasheet.ciiva.com/15096/getdatasheetpartid-48026-15096134.pdf?src-supplier=Verical, ComponentLink1URL=https://datasheet.ciiva.com/15096/getdatasheetpartid-48026-15096134.pdf?src-supplier=Verical, ComponentLink2Description=https://datasheet.ciiva.com/22653/1845221-22653354.pdf?src-supplier=Farnell, ComponentLink2URL=https://datasheet.ciiva.com/22653/1845221-22653354.pdf?src-supplier=Farnell, ComponentLink3Description=https://datasheet.ciiva.com/1508/1633692-1508723.pdf?src-supplier=Element14, ComponentLink3URL=https://datasheet.ciiva.com/1508/1633692-1508723.pdf?src-supplier=Element14, ComponentLink4Description=https://datasheet.ciiva.com/1899/txb0104-1899514.pdf?src-supplier=Digikey, ComponentLink4URL=https://datasheet.ciiva.com/1899/txb0104-1899514.pdf?src-supplier=Digikey, ComponentLink5Description=https://datasheet.ciiva.com/1899/txb0104-1899515.pdf?src-supplier=Digikey, ComponentLink5URL=https://datasheet.ciiva.com/1899/txb0104-1899515.pdf?src-supplier=Digikey, ComponentLink6Description=https://datasheet.ciiva.com/1899/txb0104-1899516.pdf?src-supplier=Digikey, ComponentLink6URL=https://datasheet.ciiva.com/1899/txb0104-1899516.pdf?src-supplier=Digikey, ComponentLink7Description=https://datasheet.ciiva.com/14287/txb0104-14287375.pdf?src-supplier=Avnet, ComponentLink7URL=https://datasheet.ciiva.com/14287/txb0104-14287375.pdf?src-supplier=Avnet, ComponentLink8Description=https://datasheet.ciiva.com/46395/1864432-46395886.pdf?src-supplier=Element14, ComponentLink8URL=https://datasheet.ciiva.com/46395/1864432-46395886.pdf?src-supplier=Element14, ComponentLink9Description=https://datasheet.ciiva.com/1508/1849862-1508724.pdf?src-supplier=Element14, ComponentLink9URL=https://datasheet.ciiva.com/1508/1849862-1508724.pdf?src-supplier=Element14, Item Type=IC, Manufacturer Part Number=TXB0104PWR, Number of Outputs=4NUMBER, Pricing="1=0.98, 10=0.878, 25=0.8336, 100=0.6848, 250=0.64012, 500=0.56568, 1000=0.44659 (USD)", RoHS=Yes, Stock=5613, Supplier=Digikey, Thickness=1mm
U11: "E-SIM IC", Manufacturer=-, Package=MFFX, Item Type=IC, Manufacturer Part Number="MFFX-M2M UICC"
U12: library part SMF05CT1G-ES, "15V 5 Unidirectional 5V SOT-363 ESD Protection Devices ROHS", LCSC Part Number=C5180312, Manufacturer=ElecSuper, Package=SOT-363, ComponentLink1Description=LCSC, ComponentLink1URL=https://www.lcsc.com/product-detail/ESD-Protection-Devices_ElecSuper-SMF05CT1G-ES_C5180312.html, Item Type="ESD Diode", Manufacturer Part Number=SMF05CT1G-ES
X1: library part CM1610H32768DZBT, "CRYSTAL 32.7680KHZ 6PF SMD", LCSC Part Number=C1985673, Manufacturer=CITIZEN, Package=SMD1610-2P, ComponentLink1Description=LCSC, ComponentLink1URL=https://www.lcsc.com/product-detail/Crystals_CITIZEN-CM1610H32768DZBT_C1985673.html, Item Type=Crystals, Manufacturer Part Number=CM1610H32768DZBT
X2: library part SIT1572AI-J3-18E-DCC-32.768E, "MEMS OSC XO 32.7680KHZ LVCMOS", Frequency=32.768kHz, Frequency Stability=50ppm, LCSC Part Number=C1988615, Manufacturer=SiTime, Max Operating Temperature=85°C, Max Supply Current=5.3uA, Min Operating Temperature=-40°C, ComponentLink1Description=https://www.sitime.com/datasheet/SiT1572?src-supplier=Digikey, ComponentLink1URL=https://www.sitime.com/datasheet/SiT1572?src-supplier=Digikey, Item Type=Oscillators, Manufacturer Part Number=SIT1572AI-J3-18E-DCC-32.768E, Mounting Technology="Surface Mount", Packaging="Cut Tape", Pricing="1=1.91, 10=1.646, 50=1.4844, 100=1.4202, 500=1.28206 (USD)", RoHS=Yes, RoHS Compliant=Yes, Series=SiT1572, Stock=1183, Supplier=Digikey
X3: library part MP07668, "32.7680 kHz GWX-2012 Crystal", Manufacturer=Golledge, Supplier Part Number=5254-MP07668CT-ND, Item Type=Crystals, Manufacturer Part Number=MP07668, Pricing="1=0.42, 10=0.362, 50=0.3264, 100=0.3122, 500=0.28148, 1000=0.26926 (USD)", RoHS=No, Stock=3456, Supplier=Digikey
X4: library part MP06003, "32.0MHz GSX-223/1P3MF SM Crystal", ESR (Equivalent Series Resistance)=50R, Frequency=32MHz, Frequency Stability=15ppm, Load Capacitance=8pF, Manufacturer=Golledge, Supplier Part Number=5254-MP06003CT-ND, Tolerance=0.001%, Item Type=Crystals, Manufacturer Part Number=MP06003, Pins=4NUMBER, Pricing="1=0.35, 10=0.305, 50=0.2744, 100=0.2624, 500=0.23662, 1000=0.22633 (USD)", RoHS=No, Stock=39472, Supplier=Digikey

## Nets (pads, with @x,y where several pads share a name; then routed paths per layer and width w, separated by ;. In a path a pad name is that pad's centre, name@x,y a point inside that pad or via, vN(x,y) a via of type N, cw(c..) or ccw(c..) an arc to the next point about the centre after c; other vN are vias at no path point)
1V8_D: C2.1 C25.2 C26.2 L2.2 R23.1 R26.1 R35.1 R36.2 U1.F9 U3.B2
1V8_S: C22.2 C23.2 C24.2 C31.2 C32.2 C34.2 C43.2 R42.2 R43.2 R44.2 R47.2 R49.2 R51.1 R52.1 U1.G5 U1.H6 U4.9 U4.10 U5.D6 U5.E6 U6.1 U6.2 U6.3 X2.3
1V8_SB: C3.1 L1.1 U1.A3 U1.H5
1V8_SLDO: C4.2 U1.G6 U1.H4
3V3: C5.2 C11.1 C51.2 L3.2 LED6.1 U1.G2 U1.H3 U8.B12
3V3_SFO: C13.2 U1.C8
5V0_B: C6.1 C7.1 C38.2 C40.2 C41.2 LED1.2 LED1.5 LED2.2 R115.2 U1.B2 U1.C2 U5.D1
32K_IN: C28.2 U3.A1 X1.2
32K_OUT: C27.2 U3.B1 X1.1
ACC_INT2: R28.1 U4.11
AFE_INT1: R52.2 R53.1 R56.1 U5.C4
AFE_INT2: R22.2 R51.2 U5.C5
AGND: C31.1 C32.1 C35.1 C36.1 C37.1 C39.2 C42.2 C43.1 R50.2 R59.2 R60.1 U5.C3 U5.C6 U5.F6 X2.4
BLE_ANT: L10.1 U8.D1
CHG_IN: C1.2 J1.1 J1.2 U1.E9
ECGN: C30.2 C39.1 R55.1 U5.A6
ECGP: C30.1 C42.1 R57.1 U5.A5
FCLK: R58.2 U5.E5
GND: Ant1.2 Ant1.3 Ant1.4 Ant1.5 C1.1 C2.2 C3.2 C4.1 C5.1 C6.2 C7.2 C8.1 C9.1 C10.1 C11.2 C12.1 C13.1 C14.1 C15.2 C16.2 C17.1 C18.1 C20.1 C21.1 C22.1 C23.1 C24.1 C25.1 C26.1 C27.1 C28.1 C29.1 C34.1 C38.1 C40.1 C41.1 C44.2 C45.2 C46.1 C47.1 C48.1 C49.1 C50.1 C51.1 C52.1 C53.1 C54.1 C55.1 C56.1 C57.1 C58.1 C59.1 C60.2 C61.1 C62.1 C63.1 C64.1 C65.1 C66.1 C68.1 C69.1 C70.1 C71.1 C72.1 C73.1 C74.1 C75.1 C76.1 C77.2 C78.2 C79.2 C80.2 C81.2 C84.1 C85.1 C86.1 C87.1 C88.2 C89.2 C90.1 C91.1 C92.1 C93.1 C94.1 D4.1 D5.1 J1.3 J1.4 J2.1 J4.2 J4.3 LED2.3 MK1.2 MK1.3 Q1.2 Q2.2 Q3.2 Q4.2 R1.1 R15.1 R16.1 R38.2 R59.1 R79.2 RT1.2 SW1.2 U1.A2 U1.A9 U1.C1 U1.E1 U1.E5 U1.E6 U1.F5 U1.F6 U1.G9 U1.H2 U2.7 U3.C2 U4.5 U4.6 U4.7 U4.8 U5.F4 U6.4 U6.5 U6.6 U8.A5 U8.B2 U8.B9 U8.B11 U8.C2 U8.D12 U8.E5 U8.E6 U8.E7 U8.E8 U8.F5 U8.F6 U8.F7 U8.F8 U8.G5 U8.G6 U8.G7 U8.G8 U8.K6 U8.K11 U9.8 U9.13 U9.19 U9.21 U9.27 U9.30 U9.31 U9.33 U9.36 U9.37 U9.45 U9.63 U9.66 U9.67 U9.69 U9.70 U9.71 U9.72 U9.73 U9.74 U9.75 U9.76 U9.77 U10.7 U11.1 U12.2 X4.2 X4.4
GPIO0_SAH: R20.2 R53.2
GPIO1_SAH: R24.2 R30.2 R39.2 R56.2
GPIO2_SAH: R108.2
GPS_ANT: C88.1 R68.1 U9.68
GPS_EN: R63.2 R64.1 U9.59
GSM_ANT: C91.2 R74.2 U9.32
GSM_DTR: R103.2
GSM_PWR_EN: R79.1 U2.4
GSM_PWR_ON: Q1.1
GSM_RI: R90.2
I2C0_SCL: R35.2 U3.B6
I2C0_SDA: R23.2 U3.A6
I2C1_SCL: R3.1 U1.F8
I2C1_SDA: R4.1 U1.E7
LED1_DRV: LED1.3 TP1.1 U5.E1
LED2_DRV: LED1.1 TP2.1 U5.F1
LED3_DRV: LED1.4 TP3.1 U5.E2
LED_RGB: Q5.2 R80.2 R114.1
LSPK_N: C82.1 C83.1 C84.2 C85.2 J3.2 U9.43
LSPK_P: C79.1 C80.1 C82.2 C83.2 J3.1 U9.44
MFIO_SAH: R104.2
MIC_N: C68.2 C69.2 U9.10
MIC_P: C67.2 C70.2 C71.2 U9.9
NET_LED: Q2.1 U9.41
NetAnt1_1: Ant1.1 C89.1 L9.2 R68.2
NetANT3_1: ANT3.1 C94.2 L11.2
NetC19_2: C19.2 R16.2
NetC20_2: C20.2 C21.2 U3.A2
NetC29_2: C29.2 U3.D1
NetC33_1: C33.1 U5.B6
NetC33_2: C33.2 U5.B5
NetC35_2: C35.2 U5.B3
NetC36_2: C36.2 U5.B4
NetC37_2: C37.2 U5.C2
NetC49_2: C49.2 U8.B5
NetC50_2: C50.2 U8.B8
NetC67_1: C67.1 C72.2 FB2.1
NetC73_2: C73.2 FB2.2 MK1.1
NetC74_2: C74.2 C75.2 MK1.4
NetC77_1: C77.1 R71.1 U11.7 U12.3
NetC78_1: C78.1 R72.1 U11.6 U12.4
NetC81_1: C81.1 R73.1 U11.3 U12.5
NetC86_2: C86.2 L6.2 U8.A7
NetC87_2: C87.2 C92.2 L7.2 U8.B1 U8.B4
NetC90_2: C90.2 D5.2 J4.1 R74.1
NetC93_2: C93.2 L10.2 L11.1
NetL1_2: L1.2 U1.A1
NetL2_1: L2.1 U1.H9
NetL3_1: L3.1 U1.H1
NetL4_1: L4.1 U1.D2
NetL4_2: L4.2 U1.D1
NetL5_1: L5.1 U2.6
NetL6_1: L6.1 U8.A9
NetL7_1: L7.1 U8.B6
NetL8_2: L8.2 U8.D11
NetL9_1: L9.1 R75.2
NetLED2_4: LED2.4 Q5.3 R115.1
NetLED3_1: LED3.1 R76.1
NetLED3_2: LED3.2 Q2.3
NetLED4_1: LED4.1 R77.1
NetLED4_2: LED4.2 Q3.3
NetLED5_1: LED5.1 R78.1
NetLED5_2: LED5.2 Q4.3
NetR13_1: R13.1 U2.3
NetR14_1: R14.1 R15.2 U2.1
NetR17_2: R17.2 U3.A3
NetR18_1: R18.1 U3.C3
NetR19_2: R19.2 U3.A4
NetR20_1: R20.1 U3.C4
NetR21_2: R21.2 U3.A5
NetR22_1: R22.1 U3.C5
NetR24_1: R24.1 U3.C6
NetR25_1: R25.1 U3.D2
NetR26_2: R26.2 R28.2 U3.B3
NetR27_1: R27.1 U3.D3
NetR29_1: R29.1 U3.D4
NetR30_1: R30.1 U4.12
NetR31_2: R31.2 U3.B4
NetR32_1: R32.1 U3.D5
NetR33_2: R33.2 U3.B5
NetR34_1: R34.1 R36.1 U3.D6
NetR37_2: R37.2 R54.2 TP7.1
NetR38_1: R38.1 R39.1 U5.F5
NetR40_2: R40.2 U5.A3
NetR41_1: R41.1 U5.E4
NetR43_1: R43.1 U6.10
NetR44_1: R44.1 U6.7
NetR45_1: R45.1 U5.D5
NetR46_1: R46.1 U5.D4
NetR48_1: R48.1 U5.D3
NetR49_1: R49.1 R50.1 U5.D2
NetR54_1: R54.1 R55.2 TP8.1
NetR57_2: R57.2 TP9.1
NetR58_1: R58.1 X2.2
NetR61_2: R61.2 U9.62
NetR62_2: R62.2 U9.61
NetR63_1: R63.1 U9.57
NetR64_2: R64.2 R65.2 U10.5
NetR66_2: R66.2 U9.2
NetR67_1: R67.1 U9.1
NetR69_2: R69.2 U9.6
NetR70_1: R70.1 U9.7
NetR80_1: R80.1 U8.L12
NetR81_1: R81.1 U8.L3
NetR82_1: R82.1 U8.K12
NetR83_1: R83.1 U8.K10
NetR84_1: R84.1 U8.K9
NetR85_1: R85.1 U8.K8
NetR86_1: R86.1 U8.K7
NetR87_1: R87.1 U8.K5
NetR88_1: R88.1 U8.K4
NetR89_1: R89.1 U8.K3
NetR90_1: R90.1 U8.K2
NetR91_1: R91.1 U8.J11
NetR92_2: R92.2 U8.C4
NetR93_1: R93.1 U8.J9
NetR94_2: R94.2 U8.C6
NetR95_1: R95.1 U8.J8
NetR96_2: R96.2 U8.C7
NetR97_1: R97.1 U8.J7
NetR98_2: R98.2 U8.C8
NetR99_1: R99.1 U8.J6
NetR100_2: R100.2 U8.C9
NetR101_1: R101.1 U8.J5
NetR102_2: R102.2 U8.C10
NetR103_1: R103.1 U8.J4
NetR104_1: R104.1 U8.J3
NetR105_1: R105.1 U8.J2
NetR106_1: R106.1 U8.H3
NetR107_2: R107.2 U8.E2
NetR108_1: R108.1 U8.H2
NetR109_2: R109.2 U8.E3
NetR110_1: R110.1 U8.H1
NetR111_2: R111.2 U8.E4
NetR112_1: R112.1 U8.G3
NetR113_2: R113.2 U8.F3
PD1_IN: D2.1 D2.2 D2.3 D2.4 D2.6 D2.7 D2.8 TP4.1 U5.A1
PD2_IN: D3.1 D3.2 D3.3 D3.4 D3.6 D3.7 D3.8 TP5.1 U5.A2
PD3_IN: D1.1 D1.2 D1.3 D1.4 D1.6 D1.7 D1.8 TP6.1 U5.B1
PD_GND: D1.5 D2.5 D3.5 R60.2 U5.C1
PM_ALRT: R11.1 U1.G7
PM_CAP: C16.1 U1.E8
PM_CSP: C15.1 R12.2 U1.C9 U1.F7
PM_INT: R9.1 U1.E3
PM_ISET: R1.2 U1.D8
PM_LED0: LED6.2 U1.A6
PM_LED1: LED6.3 U1.A5
PM_LED2: LED6.4 U1.A4
PM_MPC0: R5.1 U1.B6
PM_MPC1: R6.1 U1.B7
PM_MPC2: R7.1 U1.C3
PM_PFN1: SW1.1 U1.D4
PM_PFN2: R8.1 U1.D5
PM_RST: R10.1 U1.E4
PM_THM: R2.1 RT1.1 U1.F3
PM_TPU: R2.2 U1.D6
PM_VDIG: C14.2 U1.F4
PPS_LED: Q4.1 U9.60
PWR_KEY: Q1.3 U9.39
RLD: R37.1 R40.1 U5.A4
RSTN_SAH: C19.1 U3.C1
SIM1_CLK: R72.2 U9.16
SIM1_DATA: R73.2 U9.15
SIM1_RST: R71.2 U9.17
SIM1_VDD: C76.2 U9.18 U11.8 U12.1
SPI0_ACC_CS: R34.2 U4.2
SPI0_AFE_CS: R33.1 R45.2
SPI0_MISO: R19.1 R48.2 U4.3
SPI0_MOSI: R31.1 R46.2 R47.1 U4.4
SPI0_SCK: R21.1 R41.2 R42.1 U4.1
SPI1_CS0: R86.2
SPI1_MISO: R83.2
SPI1_MOSI: R84.2
SPI1_SCK: R85.2
STAT_LED: Q3.1 U9.42
UART1_DTR: R65.1 R69.1
UART1_RI: R70.2 U10.4
UART1_RXD: R66.1 U10.3
UART1_TXD: R67.2 U10.2
UART2_RXD: R62.1 U9.23
UART2_TXD: R61.1 U9.22
uC-UART1_RXD: R87.2
uC-UART1_TXD: R88.2
uC_RST: U8.G2
uC_SWDCLK: U8.F2
uC_SWDIO: U8.F1
VBAT: C12.2 C17.2 J2.2 R12.1 R13.2 U1.G8 U1.H7 U2.5
VDD_EXT: C65.2 U9.40 U10.1 U10.8
VDD_uC: C46.2 C47.2 C48.2 C52.2 C53.2 C54.2 C55.2 C56.2 C57.2 C58.2 C66.2 L8.1 Q5.1 R3.2 R4.2 R5.2 R6.2 R7.2 R8.2 R9.2 R10.2 R11.2 R114.2 U8.A3 U8.B7 U8.B10 U8.D2 U8.E11 U8.H11 U8.K1 U8.L5 U8.L11 U10.14
VGSM: C18.2 C60.1 C61.2 C62.2 C63.2 C64.2 D4.2 L5.2 R14.2 R75.1 R76.2 R77.2 R78.2 U2.2 U9.34 U9.35
VRTC: C59.2 U9.28
VSYS: C8.2 C9.2 C10.2 U1.B1 U1.B9 U1.D9 U1.G1 U1.H8
XC1: C44.1 U8.A1 X4.1
XC2: C45.1 U8.A2 X4.3
pads on no net: Ant1.6 Ant1.7 ANT3.2 J2.3 J2.4 J3.3 J3.4 LED1.6 LED2.1 R17.1 R18.2 R25.2 R27.2 R29.2 R32.2 R81.2 R82.2 R89.2 R91.2 R92.1 R93.2 R94.1 R95.2 R96.1 R97.2 R98.1 R99.2 R100.1 R101.2 R102.1 R105.2 R106.2 R107.1 R109.1 R110.2 R111.1 R112.2 R113.1 U1.A7 U1.A8 U1.B3 U1.B4 U1.B5 U1.B8 U1.C4 U1.C5 U1.C6 U1.C7 U1.D3 U1.D7 U1.E2 U1.F1 U1.F2 U1.G3 U1.G4 U5.B2 U5.E3 U5.F2 U5.F3 U6.8 U6.9 U8.A11 U8.A12 U8.C5 U8.C11 U8.D10 U8.E10 U8.F10 U8.F11 U8.F12 U8.G10 U8.G11 U8.H10 U8.H12 U8.J10 U8.L1 U8.L7 U8.L9 U9.3 U9.4 U9.5 U9.11 U9.12 U9.14 U9.20 U9.24 U9.25 U9.26 U9.29 U9.38 U9.46 U9.47 U9.48 U9.49 U9.50 U9.51 U9.52 U9.53 U9.54 U9.55 U9.56 U9.58 U9.64 U9.65 U10.6 U10.9 U10.10 U10.11 U10.12 U10.13 U11.0 U11.2 U11.4 U11.5 U12.6 X2.1 X3.1 X3.2

## Silkscreen, mask and mechanical layers (free items; w line width, h text height)
Mechanical 1:
  lines w0.254: 0,0 35,0 35,35 0,35 0,0 ; 24,2.604 35,2.604 35,32.604 24,32.604 24,2.604

## Text inside footprints (layer, text, board x,y; h text height)
Ant1: Top Overlay "PCB Edge" at -7.801,73.295 h0.8